# Altium PCB AthetiTech_PCB_V1.0.PcbDoc (part 1 of 3)
Units mm, origin at the board's own origin, x right, y up, seen from the top; angles counter-clockwise.
Board outline 50 x 35 mm, 2 copper layers (Top Layer, Bottom Layer); 161 components, 122 nets, 602 pads, 2 vias.
Unrouted connection lines stored in the file: 390.
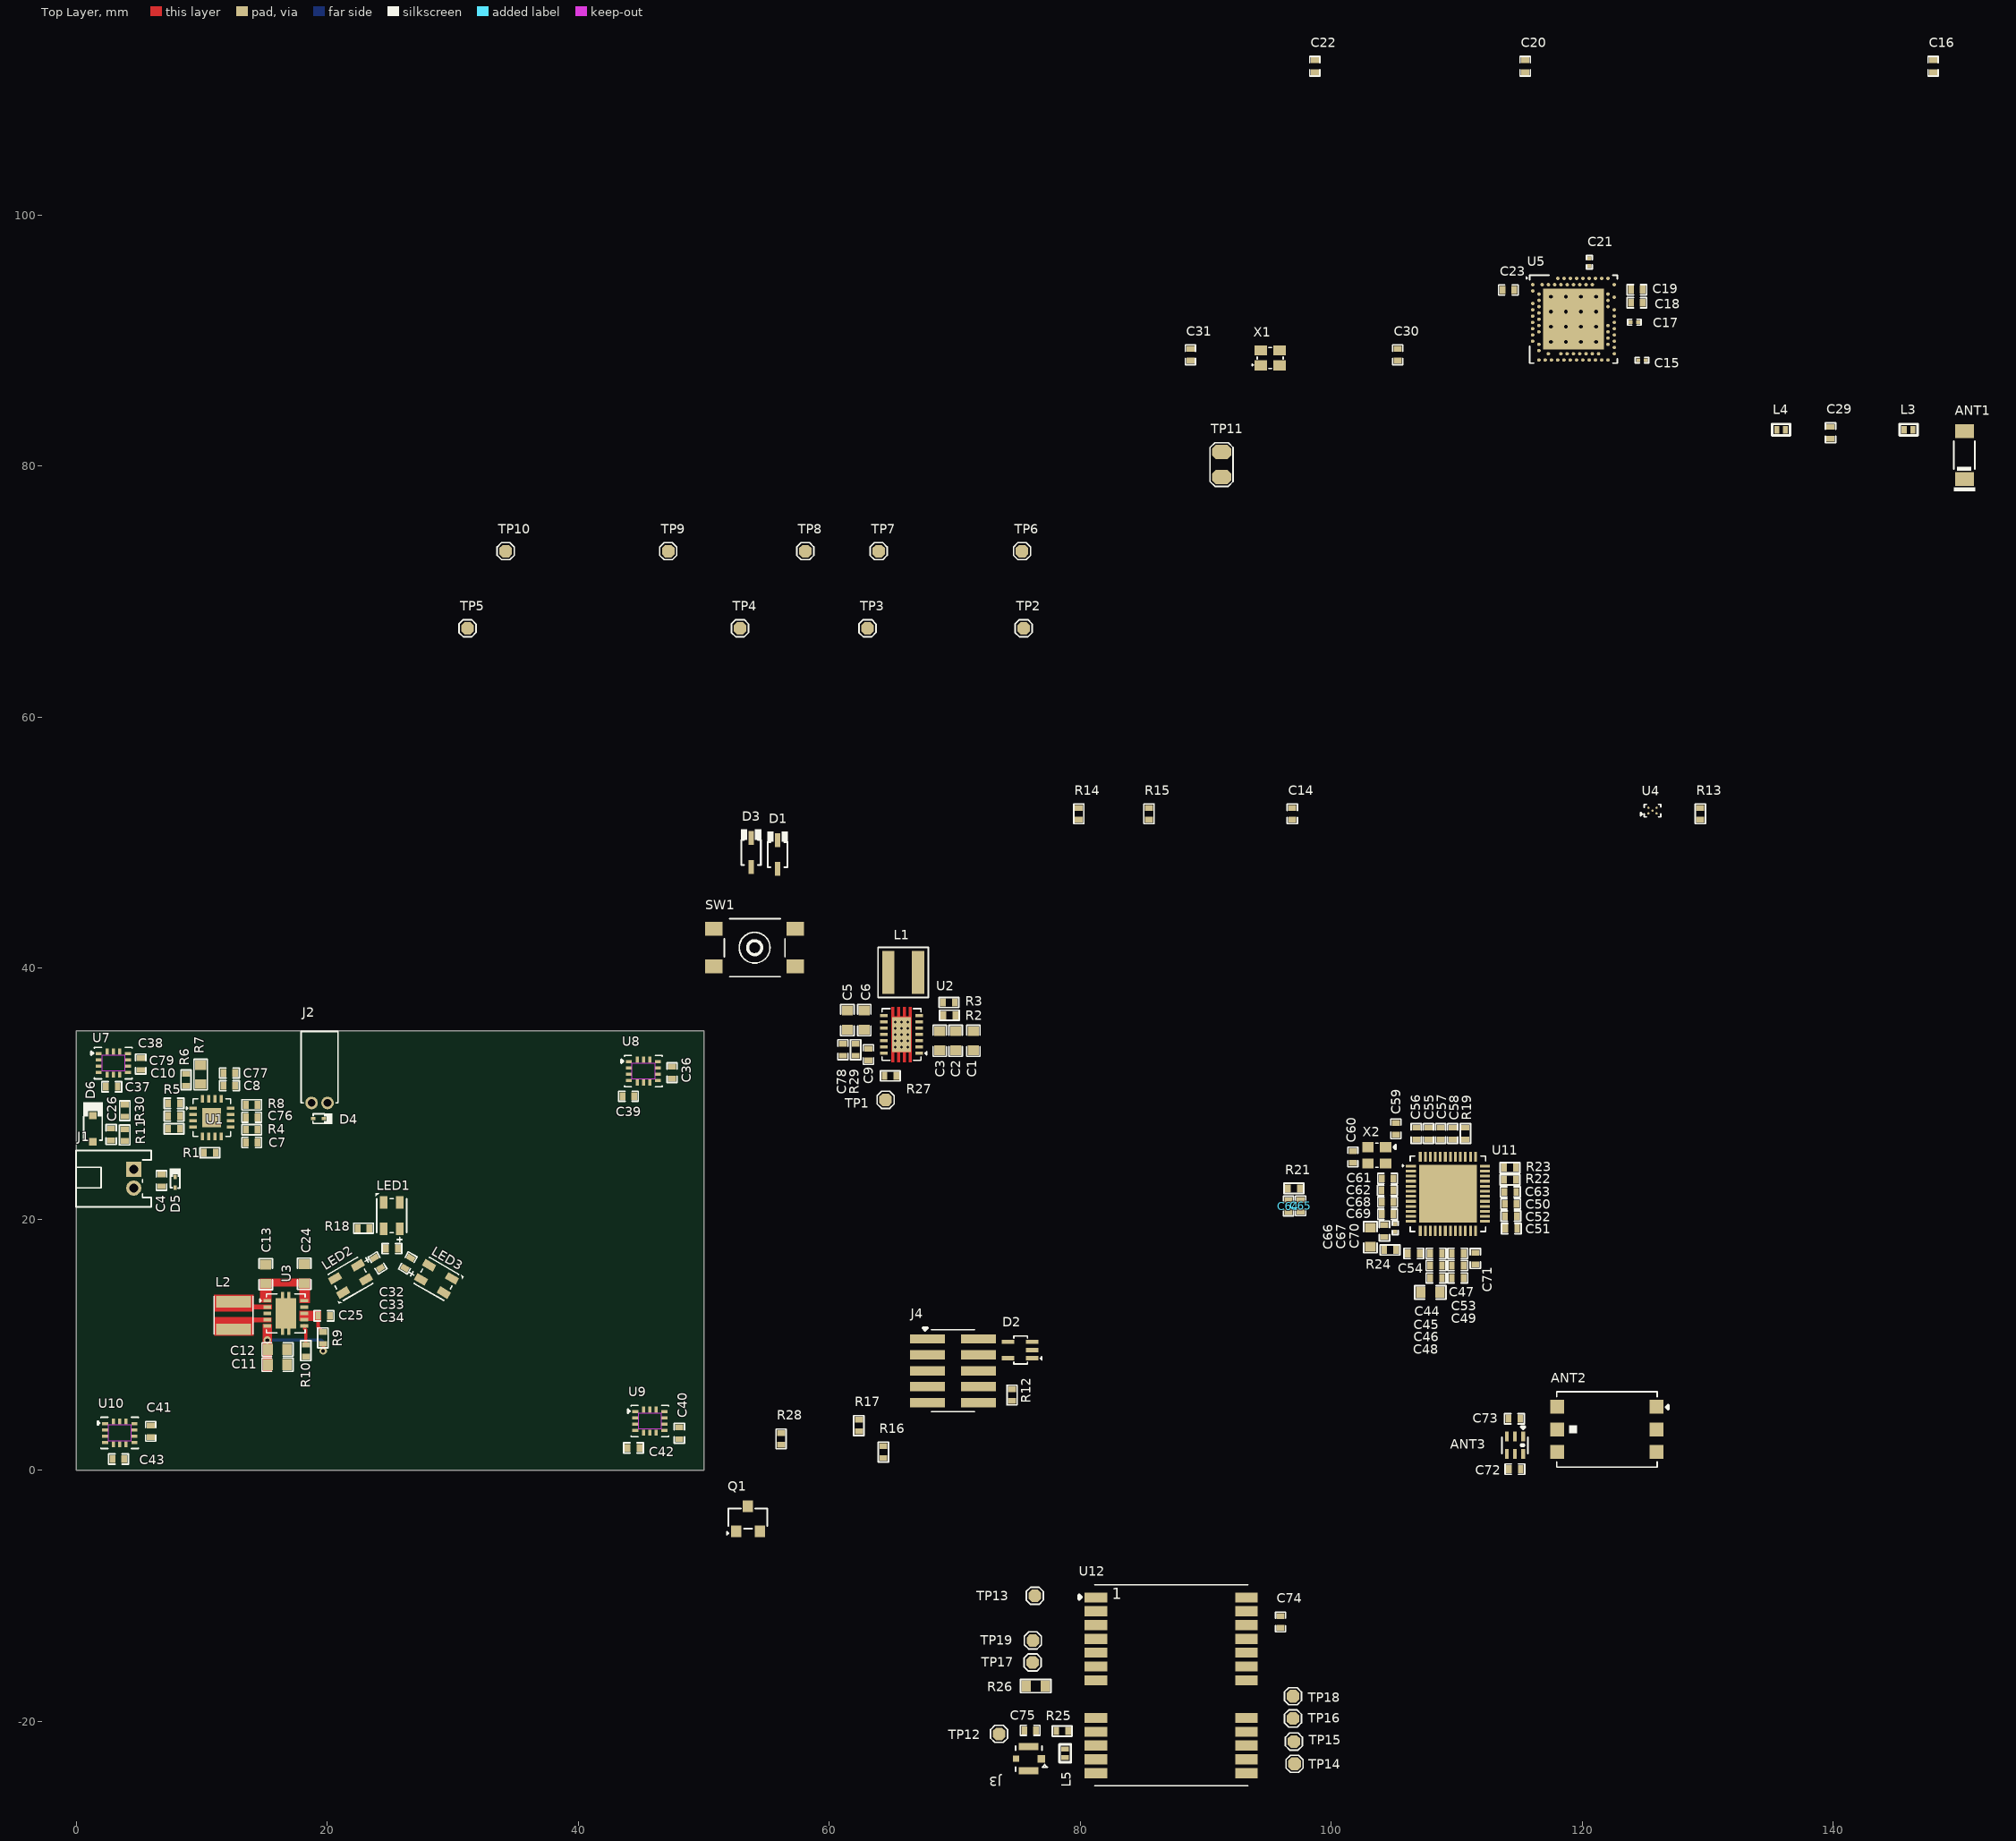
[diagram p0: Top Layer view]
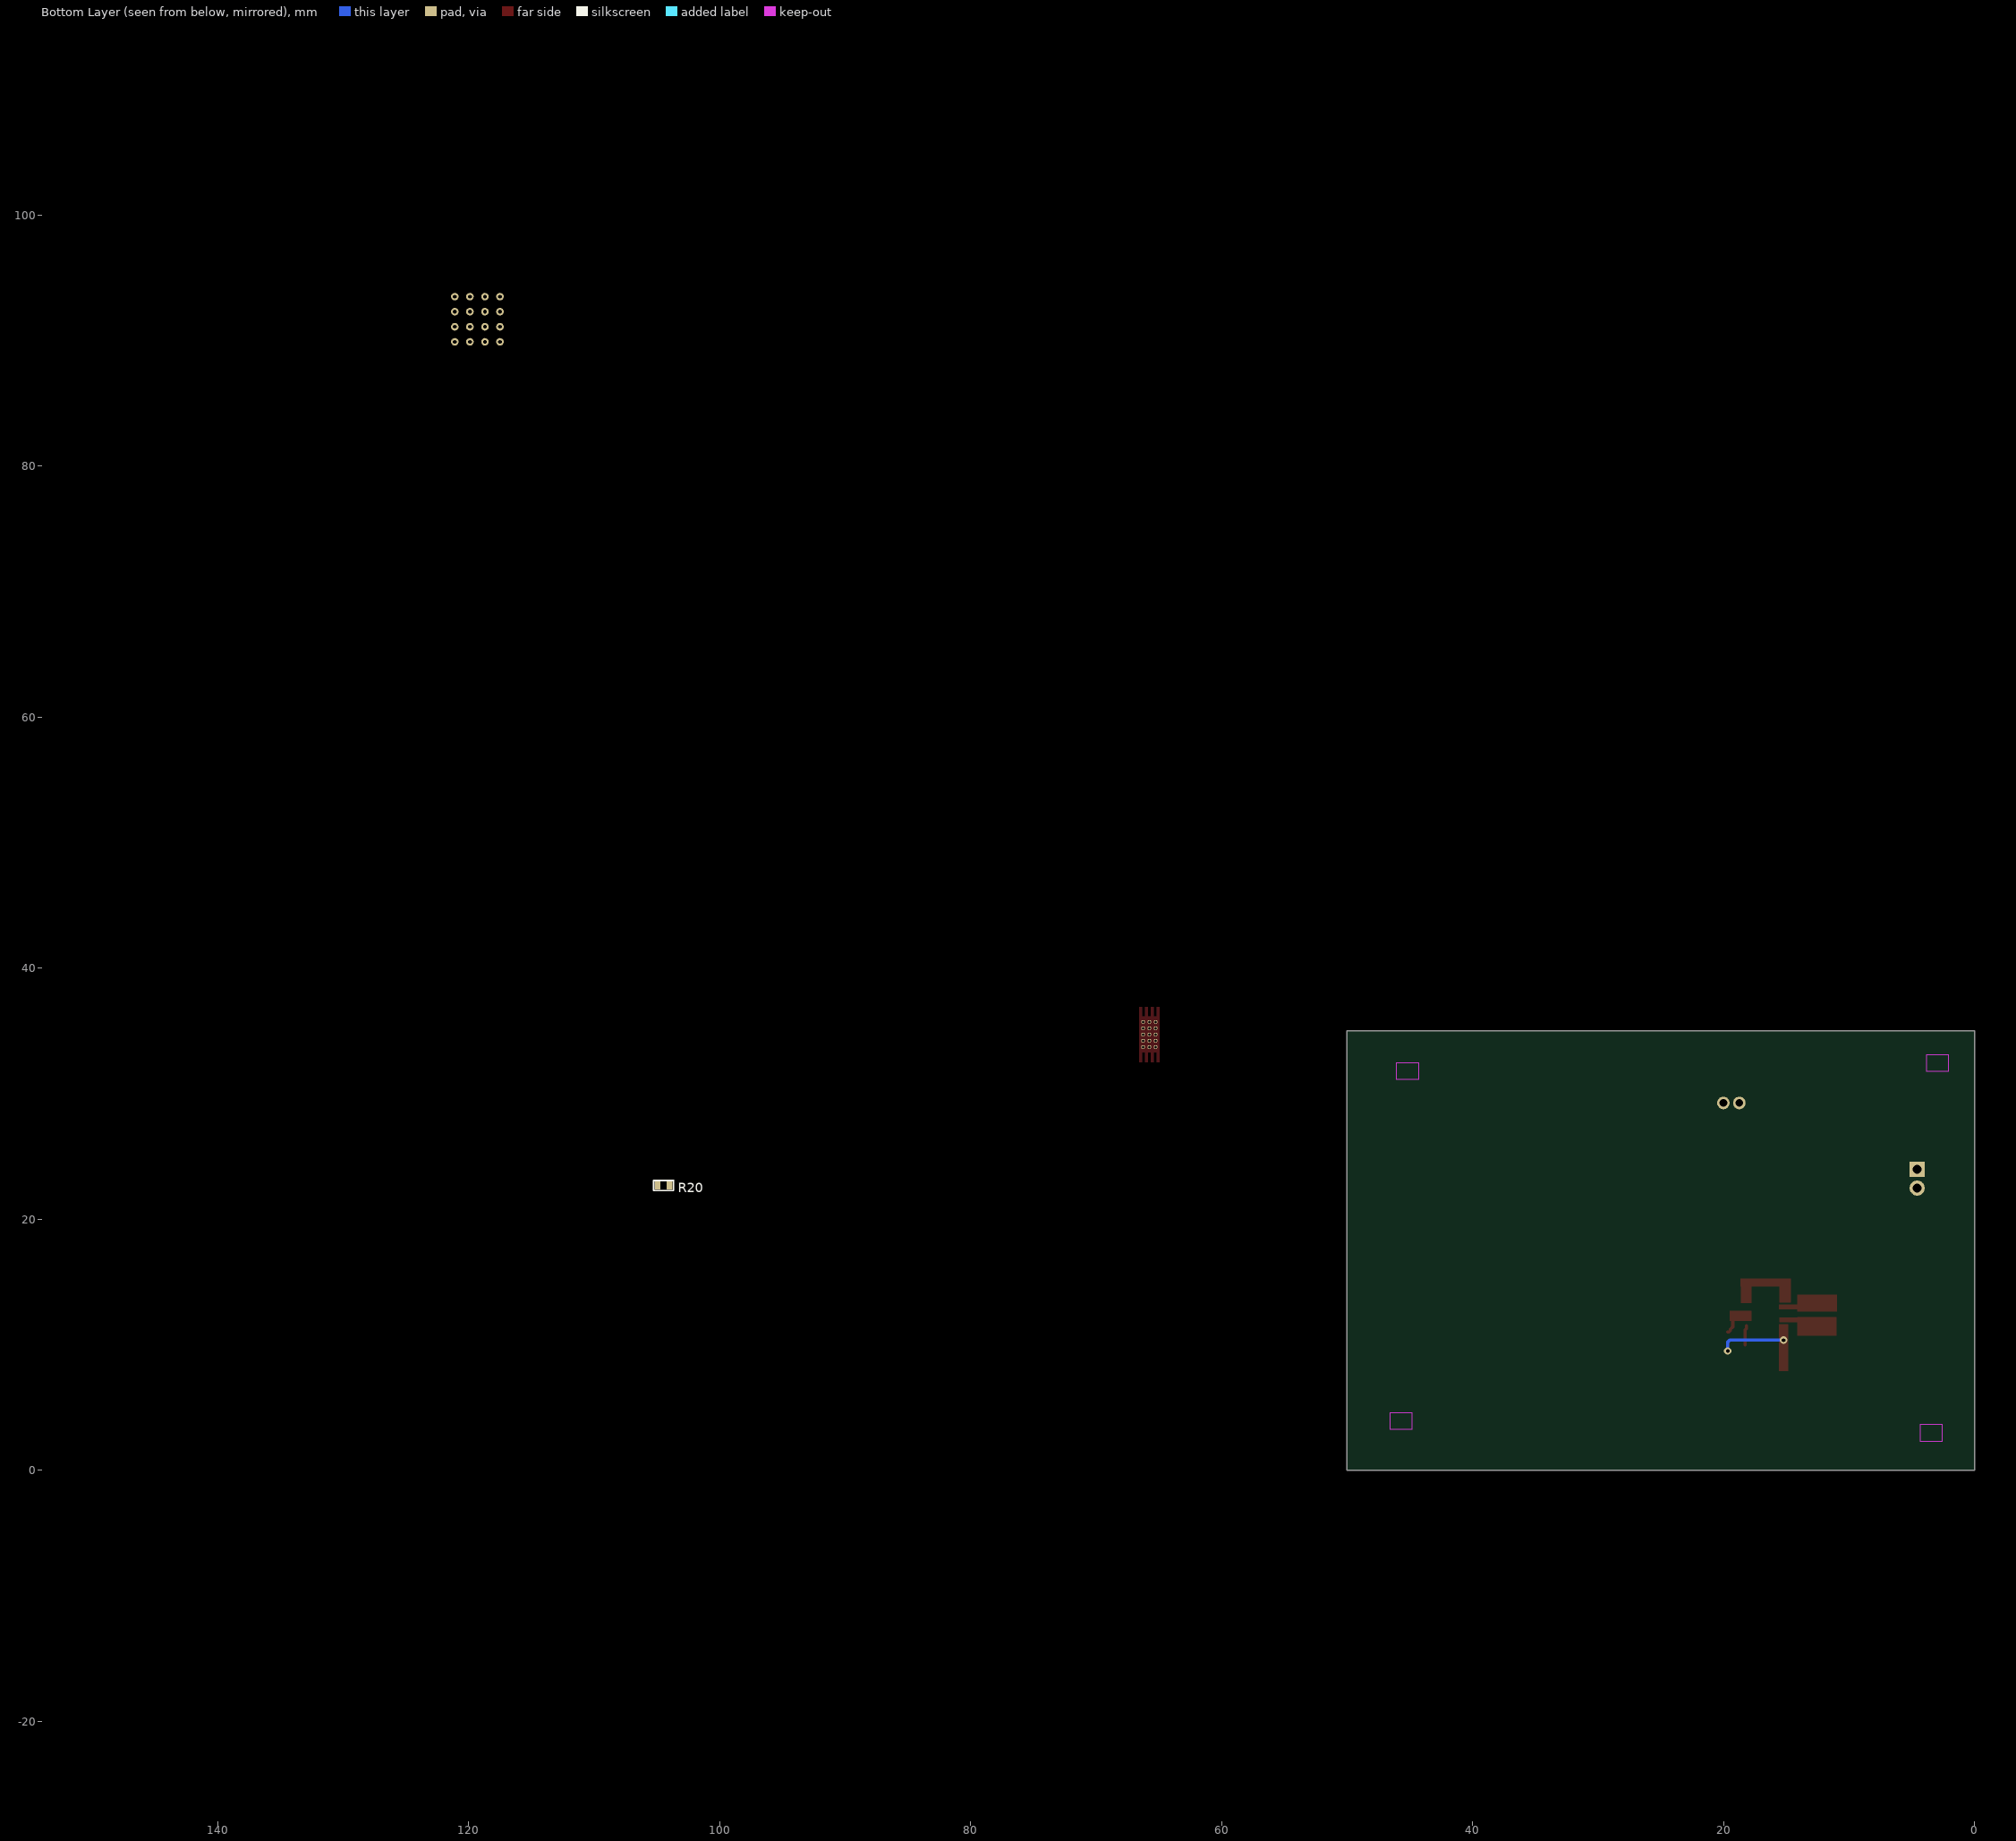
[diagram p1: Bottom Layer view, seen from below]

## Layer stack, top to bottom
Top Solder: solder mask 0.0102, Solder Resist, Dk 3.5
Top Layer: signal copper 0.0356
Dielectric 1: dielectric 0.32, FR-4, Dk 4.8
Bottom Layer: signal copper 0.0356
Bottom Solder: solder mask 0.0102, Solder Resist, Dk 3.5

## Board outline
0,0 0,35 50,35 50,0

## Design rules (kind name [scope] priority, off if disabled: settings)
Clearance [All] p1: gap=0.127 ignorepadtopadclearanceinfootprint=TRUE except(0: Arc-Hole Track-Hole SMDPad-Hole THPad-Hole Via-Hole Fill-Hole Poly-Hole Region-Hole Text-Hole; 0.178: Arc-Arc Arc-Track Arc-Fill Arc-Poly Arc-Region Track-Track Track-Fill Track-Poly Track-Region; 0.254: Arc-THPad Arc-Via Track-THPad Track-Via SMDPad-SMDPad SMDPad-THPad SMDPad-Via THPad-THPad THPad-Via THPad-Fill THPad-Poly THPad-Region Via-Via Via-Fill Via-Poly Via-Region)
PolygonConnect [All] p1: connectstyle=Relief reliefconductorwidth=0.254 reliefentries=4 polygonreliefangle="90 Angle" airgapwidth=0.254
RoutingVias [All] p1: holewidth=0.3 width=0.6 viastyle="Through Hole" minholewidth=0.3 minwidth=0.6 maxholewidth=0.3 maxwidth=0.6
SilkToSilkClearance [All] p1: silktosilkclearance=0.127
SilkToSolderMaskClearance [IsPad] p1: minsilkscreentomaskgap=0.127 clearancetoexposedcopper=TRUE
SolderMaskExpansion [All] p1: expansion=0.102 istentingtop=FALSE
Width [All] p1: maxlimit=0.254 minlimit=0.254 preferedwidth=0.254
28 further rules are at their usual default settings.

## Classes and differential pairs
component class UWB_Sheet: ANT2 ANT3 C44 C45 C46 C47 C48 C49 C50 C51 C52 C53 C54 C55 C56 C57 C58 C59 C60 C61 C62 C63 C64 C65 C66 C67 C68 C69 C70 C71 C72 C73 R19 R20 R21 R22 R23 R24 U11 X2
component class Power_Sheet: C1 C2 C3 C4 C5 C6 C7 C8 C9 C10 C76 C77 C78 C79 D1 D3 D4 D5 J1 J2 L1 R1 R2 R3 R4 R5 R6 R7 R8 R27 R29 SW1 TP1 U1 U2
component class MCU_Sheet: ANT1 C11 C12 C13 C14 C15 C16 C17 C18 C19 C20 C21 C22 C23 C24 C25 C26 C29 C30 C31 C32 C33 C34 D2 D6 J4 L2 L3 L4 LED1 LED2 LED3 Q1 R9 R10 R11 R12 R13 R14 R15 R16 R17 R18 R28 R30 TP2 TP3 TP4 TP5 TP6 TP7 TP8 TP9 TP10 TP11 U3 U4 U5 X1
component class IMU_Sheet: C36 C37 C38 C39 C40 C41 C42 C43 U7 U8 U9 U10
component class GPS_Sheet: C74 C75 J3 L5 R25 R26 TP12 TP13 TP14 TP15 TP16 TP17 TP18 TP19 U12

## Components (designator, comment, footprint, x,y, rotation, side; value= is the part's Value field where it differs from the comment)
ANT1 "2450AT18B100E" ANT-1206 150.457,80.874 r90 top
ANT2 "AH086M555003-T" AH086M555003-T 121.971,3.251 r0 top
ANT3 "HHM1595A1" HHM1595A1 114.645,1.992 r270 top
C1 "22uF" Cap-0603 71.476,34.214 r90 top
C2 "22uF" Cap-0603 70.079,34.214 r90 top
C3 "22uF" Cap-0603 68.809,34.214 r90 top
C4 "470nF" Cap-0402 6.782,23.089 r270 top
C5 "10uF" Cap-0603 61.443,35.865 r270 top
C6 "10uF" Cap-0603 62.789,35.865 r270 top
C7 "470nF" Cap-0402 13.97,26.111 r0 top
C8 "100nF" cap-0402 12.192,30.632 r180 top
C9 "100nF" cap-0402 63.119,33.122 r90 top
C10 "470nF" Cap-0402 7.785,28.219 r180 top
C11 "22uF" Cap-0603 16.027,8.407 r180 top
C12 "10uF" Cap-0603 16.027,9.627 r180 top
C13 "10uF" Cap-0603 15.088,15.621 r270 top
C14 "100nF" cap-0402 96.901,52.299 r90 top
C15 "DNP" CAP-0201 124.77,88.443 r180 top value=4.7pF
C16 "4.7uF" Cap-0402 147.968,111.862 r90 top
C17 "820pF" CAP-0201 124.16,91.465 r180 top
C18 "1uF" Cap-0402 124.358,93.015 r180 top
C19 "100pF" Cap-0402 124.358,94.056 r180 top
C20 "1uF" Cap-0402 115.456,111.862 r90 top
C21 "DNP" CAP-0201 120.574,96.245 r90 top value=4.7pF
C22 "4.7uF" Cap-0402 98.692,111.862 r90 top
C23 "100nF" cap-0402 114.122,94.031 r180 top
C24 "22uF" Cap-0603 18.161,15.646 r270 top
C25 "100nF" cap-0402 19.736,12.294 r0 top
C26 "0.1uF" Cap-0402 2.769,26.746 r90 top value=100nF
C29 "1.2pF" Cap-0402 139.789,82.652 r90 top
C30 "12pF" Cap-0402 105.296,88.875 r90 top
C31 "12pF" Cap-0402 88.786,88.875 r90 top
C32 "100nF" cap-0402 25.146,17.653 r180 top locked
C33 "100nF" cap-0402 26.416,16.51 r60 top locked
C34 "100nF" cap-0402 24.003,16.51 r301 top locked
C36 "100nF" cap-0402 47.473,31.674 r270 top
C37 "100nF" cap-0402 2.819,30.556 r180 top
C38 "100nF" cap-0402 5.131,32.36 r270 top
C39 "100nF" cap-0402 43.993,29.794 r0 top
C40 "100nF" cap-0402 48.057,2.946 r90 top
C41 "100nF" cap-0402 5.918,3.099 r270 top
C42 "100nF" cap-0402 44.399,1.778 r0 top
C43 "100nF" cap-0402 3.353,0.889 r180 top
C44 "10pF" Cap-0402 108.356,17.272 r0 top
C45 "330pF" Cap-0402 108.356,16.307 r0 top
C46 "100nF" Cap-0402 108.356,15.316 r0 top
C47 "100nF" Cap-0402 110.084,17.272 r0 top
C48 "47uF" Cap-0603 107.899,14.173 r0 top
C49 "10pF" Cap-0402 110.084,15.316 r180 top
C50 "100nF" Cap-0402 114.3,21.209 r180 top
C51 "100nF" Cap-0402 114.351,19.253 r180 top
C52 "100nF" Cap-0402 114.325,20.244 r180 top
C53 "330pF" Cap-0402 110.084,16.307 r180 top
C54 "10nF" Cap-0402 106.578,17.272 r0 top
C55 "100nF" Cap-0402 107.747,26.822 r270 top
C56 "100nF" Cap-0402 106.782,26.822 r270 top
C57 "100nF" Cap-0402 108.712,26.822 r270 top
C58 "100nF" Cap-0402 109.677,26.822 r90 top
C59 "10pF" Cap-0402 105.156,27.203 r270 top
C60 "10pF" Cap-0402 101.727,24.956 r90 top
C61 "100nF" Cap-0402 104.496,23.241 r180 top
C62 "100nF" Cap-0402 104.483,22.301 r180 top
C63 "100nF" Cap-0402 114.275,22.174 r0 top
C64 "27pF" Cap-0402 96.596,21.044 r90 top
C65 "1.2pF" Cap-0402 97.561,21.069 r90 top
C66 "820pF" Cap-0603 103.124,18.567 r90 top
C67 "100nF" Cap-0402 104.242,19.063 r90 top
C68 "100nF" Cap-0402 104.496,21.361 r0 top
C69 "100nF" Cap-0402 104.496,20.396 r0 top
C70 "18pF" CAP-0201 105.105,19.304 r90 top
C71 "100nF" Cap-0402 111.481,16.866 r270 top
C72 "12pF" Cap-0402 114.632,0.087 r0 top
C73 "12pF" Cap-0402 114.594,4.101 r0 top
C74 "100nF" cap-0402 95.961,-12.091 r90 top
C75 "100nF" cap-0402 76.01,-20.727 r0 top
C76 "4.7uF" Cap-0402 13.97,28.118 r180 top
C77 "4.7uF" Cap-0402 12.192,31.648 r180 top
C78 "100nF" cap-0402 61.087,33.503 r90 top
C79 "4.7uF" Cap-0402 7.785,29.235 r0 top
D1 "1SS404,H3F" USC 55.728,49.036 r270 top
D2 "ESDALC6V1W5" SOT-323-5 75.209,9.576 r180 top
D3 "1SS404,H3F" USC 53.619,49.2 r270 top
D4 "ESD9L5.0ST5G" SOD-923. 19.304,28.016 r180 top
D5 "ESD9L5.0ST5G" SOD-923. 7.874,22.936 r270 top
D6 "MM3Z3V3B" SOD323F 1.321,27.203 r90 top
J1 "S2B-ZR-3.4(LF)(SN)" S2B-ZR-3.4(LF)(SN) 4.572,23.229 r270 top
J2 "854-22-002-20-041101" 854-22-002-20-041101 19.38,29.261 r180 top
J3 "CONMHF4-SMD-G-T" CONMHF4-SMD-G-T 75.895,-22.987 r90 top
J4 "FTSH-105-01-L-DV-K-TR" FTSH-105-01-L-DV-K-TR 69.85,7.925 r270 top
L1 "1.5uH" XFL4020-152MEC 65.888,39.667 r0 top
L2 "2.2uH" LQH3NPN2R2MJRL 12.522,12.319 r90 top
L3 "3.3nH" IND-0402 146.012,82.906 r0 top
L4 "2.7nH" IND-0402 135.852,82.906 r0 top
L5 "27nH" IND-0402 78.791,-22.555 r270 top
LED1 "WS2812C-2427" WS2812C-2427 25.131,20.286 r90 top locked
LED2 "WS2812C-2427" WS2812C-2427 21.844,15.24 r210 top locked
LED3 "WS2812C-2427" WS2812C-2427 28.702,15.24 r330 top locked
Q1 "Si2302CDS" Sot-23 53.518,-3.861 r0 top
R1 "100K" Res-0402 10.63,25.298 r180 top
R2 "1M" Res-0402 69.571,36.246 r0 top
R3 "180K" Res-0402 69.532,37.262 r180 top value=180kR
R4 "100K" Res-0402 13.97,27.127 r180 top
R5 "10K" Res-0402 7.785,27.203 r0 top
R6 "10K" Res-0402 8.738,31.102 r90 top
R7 "1.13kΩ" Res-0603 9.906,31.521 r270 top
R8 "1.18K" Res-0402 13.97,29.108 r180 top
R9 "100R" Res-0402 19.66,10.541 r270 top
R10 "10K" Res-0402 18.288,9.525 r90 top
R11 "200K" Res-0402 3.861,26.708 r270 top value=200kR
R12 "0R" Res-0402 74.574,5.982 r270 top
R13 "1.2K" Res-0402 129.413,52.299 r90 top
R14 "4.7K" Res-0402 79.883,52.299 r90 top
R15 "4.7K" Res-0402 85.471,52.299 r90 top
R16 "10K" Res-0402 64.313,1.448 r90 top
R17 "10K" Res-0402 62.357,3.556 r90 top
R18 "330R" Res-0402 22.885,19.279 r180 top
R19 "100K" Res-0402 110.693,26.822 r90 top
R20 "11K" Res-0402 104.47,22.682 r0 bottom value=11kR
R21 "16K" Res-0402 97.028,22.454 r0 top value=16R
R22 "10K" Res-0402 114.249,23.139 r180 top
R23 "10K" Res-0402 114.249,24.105 r0 top
R24 "270R" Res-0402 104.699,17.551 r180 top
R25 "10R" Res-0402 78.562,-20.777 r0 top
R26 "0R" Res-0603 76.454,-17.196 r180 top
R27 "1M" Res-0402 64.872,31.42 r180 top
R28 "1K" Res-0402 56.159,2.489 r90 top
R29 "10K" Res-0402 62.103,33.503 r270 top
R30 "100K" Res-0402 3.861,28.651 r90 top
SW1 "TS-1109S-C-B" TS-1109S-C-B 54.051,41.631 r0 top
TP1 "TEST POINT 0.5mm Dia" "Test-point - 0.5mm" 64.491,29.515 r270 top
TP2 "TEST POINT 0.5mm Dia" "Test-point - 0.5mm" 75.489,67.081 r90 top
TP3 "TEST POINT 0.5mm Dia" "Test-point - 0.5mm" 63.043,67.081 r90 top
TP4 "TEST POINT 0.5mm Dia" "Test-point - 0.5mm" 52.883,67.081 r90 top
TP5 "TEST POINT 0.5mm Dia" "Test-point - 0.5mm" 31.166,67.081 r90 top
TP6 "TEST POINT 0.5mm Dia" "Test-point - 0.5mm" 75.362,73.228 r90 top
TP7 "TEST POINT 0.5mm Dia" "Test-point - 0.5mm" 63.932,73.228 r90 top
TP8 "TEST POINT 0.5mm Dia" "Test-point - 0.5mm" 58.09,73.228 r90 top
TP9 "TEST POINT 0.5mm Dia" "Test-point - 0.5mm" 47.168,73.228 r90 top
TP10 "TEST POINT 0.5mm Dia" "Test-point - 0.5mm" 34.214,73.228 r90 top
TP11 "2 Test Pad" "2 Test Pad" 91.262,79.128 r90 top
TP12 "TEST POINT 0.5mm Dia" "Test-point - 0.5mm" 73.533,-21.006 r90 top
TP13 "TEST POINT 0.5mm Dia" "Test-point - 0.5mm" 76.378,-10.008 r90 top
TP14 "TEST POINT 0.5mm Dia" "Test-point - 0.5mm" 97.079,-23.394 r90 top
TP15 "TEST POINT 0.5mm Dia" "Test-point - 0.5mm" 97.028,-21.616 r90 top
TP16 "TEST POINT 0.5mm Dia" "Test-point - 0.5mm" 96.952,-19.787 r90 top
TP17 "TEST POINT 0.5mm Dia" "Test-point - 0.5mm" 76.2,-15.316 r90 top
TP18 "TEST POINT 0.5mm Dia" "Test-point - 0.5mm" 96.952,-18.009 r90 top
TP19 "TEST POINT 0.5mm Dia" "Test-point - 0.5mm" 76.225,-13.564 r90 top
U1 "BQ24075RGTT" VQFN-16(3x3) 10.795,28.093 r0 top
U2 "TPS63020DSJR" "14-VSON (4x3)" 65.761,34.714 r180 top
U3 "TPS63002DRCR" "10-VSON (3x3)" 16.688,12.497 r0 top
U4 "TLV493DA2BWXTMA1" WLCSP-5(0.9x1.1) 125.603,52.553 r0 top
U5 "NRF52840-QIAA-R7" "73-QFN (7x7)" 119.307,91.704 r0 top
U7 "ICM-45686" LGA-14(3x2.5) 2.946,32.436 r0 top
U8 "ICM-45686" LGA-14(3x2.5) 45.187,31.801 r0 top
U9 "ICM-45686" LGA-14(3x2.5) 45.701,3.916 r0 top
U10 "ICM-45686" LGA-14(3x2.5) 3.454,2.972 r0 top
U11 "DW1000-I-TR13" QFN-48-EP(6x6) 109.296,22.026 r0 top
U12 "NEO-M9N-00B" NEO-M9N-00B 81.252,-10.139 r0 top
X1 "32MHz" SMD2016-4P 95.136,88.621 r0 top
X2 "38.4Mhz" XC21M4-38.400-F10NNHPK 103.632,25.095 r180 top

## Footprints (in the part's own frame and the unit in brackets; to place one, negate y for a bottom-side part, rotate by r counter-clockwise, add the part's x,y. Pads: shape width x height; smd on the part's side, far side on the other; paste and mask are expansions set on the pad)
"2 Test Pad" [mil]
  oct 45x60 smd: 1(0,0) 2(78.74,0)
  silkscreen extent -29,-36 108,36
"10-VSON (3x3)" [mm]
  rect 0.62x0.26 smd: 1(-1.475,1) 2(-1.475,0.5) 3(-1.475,0) 4(-1.475,-0.5) 5(-1.475,-1) 6(1.475,-1) 7(1.475,-0.5) 8(1.475,0) 9(1.475,0.5) 10(1.475,1)
  rect 0.25x0.55 smd: 11(-0.25,-1.45) 11(-0.25,1.45) 11(0.25,-1.45) 11(0.25,1.45)
  rect 1.65x2.4 smd: 11(0,0)
  silkscreen extent -2.08,-1.55 1.55,1.55, body extent -1.5,-1.5 1.5,1.5, height 1
"14-VSON (4x3)" [mm]
  rect 0.6x0.24 smd: 1(-1.4,1.5) 2(-1.4,1) 3(-1.4,0.5) 4(-1.4,0) 5(-1.4,-0.5) 6(-1.4,-1) 7(-1.4,-1.5) 8(1.4,-1.5) 9(1.4,-1) 10(1.4,-0.5) 11(1.4,0) 12(1.4,0.5) 13(1.4,1) 14(1.4,1.5)
  round 0.3 hole 0.2: 15(-0.5,0.5) 15(-0.5,1) 15(-0.5,0) 15(-0.5,-1) 15(-0.5,-0.5) 15(0,1) 15(0,0.5) 15(0,0) 15(0,-0.5) 15(0,-1) 15(0.5,0.5) 15(0.5,1) 15(0.5,0) 15(0.5,-1) 15(0.5,-0.5)
  rect 1.5x2.8 smd: 15(0,0)
  Top Layer region: 0.79,-2.2 0.59,-2.2 0.59,-1.425 0.33,-1.425 0.33,-2.2 0.13,-2.2 0.13,-1.425 -0.13,-1.425 -0.13,-2.2 -0.33,-2.2 -0.33,-1.425 -0.59,-1.425 -0.59,-2.2 -0.79,-2.2 -0.79,2.2 -0.59,2.2 -0.59,1.425 -0.33,1.425 -0.33,2.2 -0.13,2.2 -0.13,1.425 0.13,1.425 0.13,2.2 0.33,2.2 0.33,1.425 0.59,1.425 0.59,2.2 0.79,2.2
  silkscreen extent -2.01,-2.06 1.55,2.06, body extent -1.5,-2 1.5,2, height 1
"73-QFN (7x7)" [mm]
  rect 4.85x4.85 smd paste-3: 74(0,0)
  round 0.6 hole 0.305 mask+0: 74_1(-1.8,1.8) 74_2(-0.6,1.8) 74_3(0.6,1.8) 74_4(1.8,1.8) 74_5(-1.8,0.6) 74_6(-0.6,0.6) 74_7(0.6,0.6) 74_8(1.8,0.6) 74_9(-1.8,-0.6) 74_10(-0.6,-0.6) 74_11(0.6,-0.6) 74_12(1.8,-0.6) 74_13(-1.8,-1.8) 74_14(-0.6,-1.8) 74_15(0.6,-1.8) 74_16(1.8,-1.8)
  round 0.275 smd: A8(-1.25,3.25) A10(-0.75,3.25) A12(-0.25,3.25) A14(0.25,3.25) A16(0.75,3.25) A18(1.25,3.25) A20(1.75,3.25) A22(2.25,3.25) A23(2.75,3.25) AA24(3.25,-2.25) AB2(-2.75,-2.5) AC5(-2,-2.75) AC9(-1,-2.75) AC11(-0.5,-2.75) AC13(0,-2.75) AC15(0.5,-2.75) AC17(1,-2.75) AC19(1.5,-2.75) AC21(2,-2.75) AC24(3.25,-2.75) AD2(-2.75,-3.25) AD4(-2.25,-3.25) AD6(-1.75,-3.25) AD8(-1.25,-3.25) AD10(-0.75,-3.25) AD12(-0.25,-3.25) AD14(0.25,-3.25) AD16(0.75,-3.25) AD18(1.25,-3.25) AD20(1.75,-3.25) AD22(2.25,-3.25) AD23(2.75,-3.25) B1(-3.25,2.75) B3(-2.5,2.75) B5(-2,2.75) B7(-1.5,2.75) B9(-1,2.75) B11(-0.5,2.75) B13(0,2.75) B15(0.5,2.75) B17(1,2.75) B19(1.5,2.75) B24(3.25,2.75) C1(-3.25,2.25) D2(-2.75,2) D23(2.75,2) E24(3.25,1.75) F2(-2.75,1.5) F23(2.75,1.5) G1(-3.25,1.25) H2(-2.75,1) H23(2.75,1) J1(-3.25,0.75) J24(3.25,0.75) K2(-2.75,0.5) L1(-3.25,0.25) L24(3.25,0.25) M2(-2.75,0) N1(-3.25,-0.25) N24(3.25,-0.25) P2(-2.75,-0.5) P23(2.75,-0.5) R1(-3.25,-0.75) R24(3.25,-0.75) T2(-2.75,-1) T23(2.75,-1) U1(-3.25,-1.25) U24(3.25,-1.25) V23(2.75,-1.5) W1(-3.25,-1.75) W24(3.25,-1.75) Y2(-2.75,-2) Y23(2.75,-2)
  silkscreen extent -3.76,-3.5 3.5,3.5, body extent -3.5,-3.5 3.5,3.5, height 0.85
854-22-002-20-041101 [mm]
  round 1 hole 0.62: 1(-0.635,0) 2(0.635,0)
  silkscreen extent -1.47,-5.69 1.47,0, body extent -1.45,-7.35 1.47,0.19, height 2.16
AH086M555003-T [mm]
  rect 1.1x1.1 smd: 1(3.95,1.8) 2(3.95,0) 3(3.95,-1.8) 4(-3.95,-1.8) 5(-3.95,0) 6(-3.95,1.8)
  silkscreen extent -4,-3 4.88,3, body extent -4.01,-3 4.01,3, height 1.02
ANT-1206 [mm]
  rect 1.1x1.5 smd: 1(-1.9,0) 2(1.9,0)
  silkscreen extent -2.89,-0.86 1.12,0.84, body extent -1.6,-0.8 1.6,0.8, height 1
CAP-0201 [mm]
  rect 0.3x0.3 smd mask+0.055: 1(-0.3,0) 2(0.3,0)
  silkscreen extent -0.53,-0.23 0.53,0.23, body extent -0.3,-0.15 0.3,0.15, height 0.28
Cap-0402 [mil]
  rect 18x25 smd mask+2.36: 1(-18.5,0) 2(18.5,0)
  silkscreen extent -31,-16 31,16, body extent -20,-10 20,10, height 19
cap-0402 [mil]
  rect 18x25 smd mask+2.36: 1(-18.5,0) 2(18.5,0)
  silkscreen extent -31,-16 31,16, body extent -20,-10 20,10, height 19
Cap-0603 [mil]
  rect 30x35 smd mask+2.36: 1(-30,0) 2(30,0)
  silkscreen extent -49,-21 49,21, body extent -32,-16 31,16, height 34
CONMHF4-SMD-G-T [mm]
  rect 0.6x0.6 smd: 1(0,-1)
  rect 0.58x1.58 smd: S1(-0.96,0) S3(0.96,0)
  rect 0.5x0.5 smd: S2(0,1)
  silkscreen extent -1,-1.48 1,1.05, body extent -1,-1 1,1, height 0.6
FTSH-105-01-L-DV-K-TR [mm]
  rect 0.74x2.79 smd: 01(-2.54,-2.035) 02(-2.54,2.035) 03(-1.27,-2.035) 04(-1.27,2.035) 05(0,-2.035) 06(0,2.035) 07(1.27,-2.035) 08(1.27,2.035) 09(2.54,-2.035) 10(2.54,2.035)
  silkscreen extent -3.4,-2.37 3.26,1.72, body extent -3.18,-2.92 3.18,2.92, height 5.96
HHM1595A1 [mm]
  rect 0.8x0.3 smd: 1(-0.7,0.65) 2(-0.7,0) 3(-0.7,-0.65) 4(0.7,-0.65) 5(0.7,0) 6(0.7,0.65)
  silkscreen extent -1.46,-1.03 0.65,1.03, body extent -0.63,-1 0.63,1, height 0.95
IND-0402 [mm]
  rect 0.4x0.6 smd: 1(-0.35,0) 2(0.35,0)
  silkscreen extent -0.71,-0.46 0.71,0.46, body extent -0.5,-0.25 0.5,0.25, height 0.25
LGA-14(3x2.5) [mm]
  rect 0.475x0.25 smd mask+0.05: 1(-1.162,0.75) 2(-1.162,0.25) 3(-1.162,-0.25) 4(-1.162,-0.75) 8(1.162,-0.75) 9(1.162,-0.25) 10(1.162,0.25) 11(1.162,0.75)
  rect 0.25x0.475 smd mask+0.05: 5(-0.5,-0.913) 6(0,-0.913) 7(0.5,-0.913) 12(0.5,0.913) 13(0,0.913) 14(-0.5,0.913)
  Keep-Out Layer region: 0.9,-0.65 -0.9,-0.65 -0.9,0.65 0.9,0.65
  silkscreen extent -1.75,-1.25 1.5,1.25, body extent -1.5,-1.25 1.5,1.25, height 0.86
LQH3NPN2R2MJRL [mm]
  rect 0.9x2.8 smd: 1(-1.1,0) 2(1.1,0)
  silkscreen extent -1.47,-1.55 1.52,1.55, body extent -1.5,-1.5 1.5,1.5, height 1.2
NEO-M9N-00B [mm]
  rect 1.8x0.8 smd paste-2: 1(0,0) 2(0,-1.1) 3(0,-2.2) 4(0,-3.3) 5(0,-4.4) 6(0,-5.5) 7(0,-6.6) 8(0,-9.6) 9(0,-10.7) 10(0,-11.8) 11(0,-12.9) 12(0,-14) 13(12,-14) 14(12,-12.9) 15(12,-11.8) 16(12,-10.7) 17(12,-9.6) 18(12,-6.6) 19(12,-5.5) 20(12,-4.4) 21(12,-3.3) 22(12,-2.2) 23(12,-1.1) 24(12,0)
  silkscreen extent -1.35,-15 12.1,1, body extent -0.1,-15 12.1,1, height 2.6
QFN-48-EP(6x6) [mm]
  rect 0.81x0.22 smd mask+0.07: 1(-2.95,2.2) 2(-2.95,1.8) 3(-2.95,1.4) 4(-2.95,1) 5(-2.95,0.6) 6(-2.95,0.2) 7(-2.95,-0.2) 8(-2.95,-0.6) 9(-2.95,-1) 10(-2.95,-1.4) 11(-2.95,-1.8) 12(-2.95,-2.2) 25(2.95,-2.2) 26(2.95,-1.8) 27(2.95,-1.4) 28(2.95,-1) 29(2.95,-0.6) 30(2.95,-0.2) 31(2.95,0.2) 32(2.95,0.6) 33(2.95,1) 34(2.95,1.4) 35(2.95,1.8) 36(2.95,2.2)
  rect 0.22x0.81 smd mask+0.07: 13(-2.2,-2.95) 14(-1.8,-2.95) 15(-1.4,-2.95) 16(-1,-2.95) 17(-0.6,-2.95) 18(-0.2,-2.95) 19(0.2,-2.95) 20(0.6,-2.95) 21(1,-2.95) 22(1.4,-2.95) 23(1.8,-2.95) 24(2.2,-2.95) 37(2.2,2.95) 38(1.8,2.95) 39(1.4,2.95) 40(1,2.95) 41(0.6,2.95) 42(0.2,2.95) 43(-0.2,2.95) 44(-0.6,2.95) 45(-1,2.95) 46(-1.4,2.95) 47(-1.8,2.95) 48(-2.2,2.95)
  rect 4.6x4.6 smd paste-3: 49(0,0)
  silkscreen extent -3.61,-3 3,3, body extent -3,-3 3,3, height 0.9
Res-0402 [mil]
  rect 18x25 smd mask+2.17: 1(-18.5,0) 2(18.5,0)
  silkscreen extent -32,-17 32,16, body extent -23,-11 23,11, height 16
Res-0603 [mil]
  rect 30x35 smd: 1(-30,0) 2(30,0)
  silkscreen extent -48,-21 48,21, body extent -31,-17 31,17, height 18
S2B-ZR-3.4(LF)(SN) [mm]
  rect 1.2x1.2 hole 0.7: 1(-0.75,0)
  round 1.2 hole 0.7: 2(0.75,0)
  silkscreen extent -2.25,-4.6 2.25,1.4, body extent -2.25,-4.62 2.25,1.38, height 3.6
SMD2016-4P [mm]
  rect 1x0.8 smd paste+0 mask+0.051: 1(-0.75,-0.6) 2(0.75,-0.6) 3(0.75,0.6) 4(-0.75,0.6)
  silkscreen extent -1.42,-0.84 1.04,0.84, body extent -1,-0.8 1,0.8, height 0.47
SOD323F [mm]
  rect 0.6x0.6 smd: 1(-1.05,0) 2(1.05,0)
  silkscreen extent -0.91,-0.79 2.11,0.79, body extent -1.25,-0.68 1.25,0.68, height 1
SOD-923. [mm]
  rect 0.36x0.27 smd: 1(-0.42,0) 2(0.42,0)
  silkscreen extent -1.12,-0.43 0.46,0.43, body extent -0.52,-0.32 0.53,0.33, height 0.43
Sot-23 [mm] "TRANS NPN 40V 0.6A SOT23"
  rect 0.82x0.92 smd: 1(-0.95,-1) 2(0.95,-1) 3(0,1)
  silkscreen extent -1.68,-1.3 1.55,0.81, body extent -1.5,-1.25 1.5,1.25, height 1.05
SOT-323-5 [mm]
  rect 1x0.35 smd: 1(-0.95,0.65) 2(-0.95,0) 3(-0.95,-0.65) 4(0.95,-0.65) 5(0.95,0.65)
  silkscreen extent -1.73,-1.12 0.51,1.12, body extent -1.05,-1.05 1.05,1.05, height 1
"Test-point - 0.5mm" [mm]
  oct 1x1 smd: 1(0,0)
  silkscreen extent -0.68,-0.68 0.68,0.68
TS-1109S-C-B [mm]
  rect 1.4x1.1 smd: 1(-3.25,-1.5) 2(3.25,-1.5) 3(3.25,1.5) 4(-3.25,1.5)
  silkscreen extent -2.41,-2.31 2.41,2.31, body extent -3.5,-2.25 3.5,2.25, height 4.3
USC [mil]
  rect 43.75x17.75 smd: 1(-46,6) 2(44.55,6)
  silkscreen extent -73,-27 39,38, body extent -54,-20 52,32, height 43
VQFN-16(3x3) [mm]
  rect 0.6x0.25 smd paste-100 mask+0.051: 1(-1.5,0.748) 2(-1.5,0.249) 3(-1.5,-0.252) 4(-1.5,-0.751) 9(1.5,-0.75) 10(1.5,-0.25) 11(1.5,0.25) 12(1.5,0.748)
  rect 0.25x0.6 smd paste-100 mask+0.051: 5(-0.748,-1.5) 6(-0.248,-1.5) 7(0.252,-1.5) 8(0.752,-1.5) 13(0.752,1.5) 14(0.252,1.5) 15(-0.248,1.5) 16(-0.748,1.5)
  rect 1.5x1.5 smd paste-100 mask+0.051: 17(0,0)
  silkscreen extent -2.03,-1.5 1.5,1.5, body extent -1.51,-1.5 1.49,1.5, height 1
WLCSP-5(0.9x1.1) [mm]
  round 0.18 smd paste-100 mask+0.05: A1(-0.329,-0.229) A3(-0.329,0.229) B2(0,0) C1(0.329,-0.229) C3(0.329,0.229)
  silkscreen extent -0.94,-0.5 0.66,0.5, body extent -0.57,-0.47 0.57,0.46, height 0.59
WS2812C-2427 [mm]
  rect 1x0.6 smd paste+0 mask+0.051: 1(-1.05,0.65) 2(-1.05,-0.65) 3(1.05,-0.65) 4(1.05,0.65)
  silkscreen extent -2.1,-1.2 1.78,1.27, body extent -1.35,-1.2 1.35,1.2, height 1.12
XC21M4-38.400-F10NNHPK [mm]
  rect 0.9x0.8 smd: 1(-0.7,-0.65) 2(0.7,-0.65) 3(0.7,0.65) 4(-0.7,0.65)
  silkscreen extent -1.51,-0.97 0.1,0.97
XFL4020-152MEC [mm]
  rect 0.98x3.4 smd: 1(-1.185,0) 2(1.185,0)
  silkscreen extent -2,-2 2,2, body extent -1.99,-2.01 2.01,1.99, height 2.1

## Part data
ANT1: "RF ANT 2.4GHZ CHIP SOLDER SMD", Manufacturer=Johanson, Category="RF Antennas", ComponentLink1Description=https://datasheet.ciiva.com/24025/antenna-2450at18b100-242422-24025839.pdf?src-supplier=Mouser, ComponentLink1URL=https://datasheet.ciiva.com/24025/antenna-2450at18b100-242422-24025839.pdf?src-supplier=Mouser, ComponentLink2Description=https://datasheet.ciiva.com/1124/1318299-1124918.pdf?src-supplier=Element14, ComponentLink2URL=https://datasheet.ciiva.com/1124/1318299-1124918.pdf?src-supplier=Element14, Manufacturer Part Number=2450AT18B100E, Pricing="3000=0.3724, 6000=0.3688, 9000=0.3651, 12000=0.3615, 15000=0.3579, 30000=0.3542 (USD)", RoHS=Yes, Stock=792000, Supplier="Arrow Electronics", Supplier Part Number=2450AT18B100E
ANT2: "RF ANT 3.5GHZ/5.6GHZ CHIP SLD", LCSC Part Number=C94132, Manufacturer="Taiyo Yuden", ComponentLink1Description=https://datasheet.ciiva.com/2791/ah-086m555003-ss-2791894.pdf?src-supplier=Digikey, ComponentLink1URL=https://datasheet.ciiva.com/2791/ah-086m555003-ss-2791894.pdf?src-supplier=Digikey, ComponentLink2Description=https://datasheet.ciiva.com/28414/1918813-28414122.pdf?src-supplier=Element14, ComponentLink2URL=https://datasheet.ciiva.com/28414/1918813-28414122.pdf?src-supplier=Element14, ComponentLink3Description=https://datasheet.ciiva.com/3306/chipantenna01-e-3306567.pdf?src-supplier=Avnet, ComponentLink3URL=https://datasheet.ciiva.com/3306/chipantenna01-e-3306567.pdf?src-supplier=Avnet, ComponentLink4Description=https://datasheet.ciiva.com/8153/chipantenna01-e-8153000.pdf?src-supplier=Avnet, ComponentLink4URL=https://datasheet.ciiva.com/8153/chipantenna01-e-8153000.pdf?src-supplier=Avnet, ComponentLink5Description=https://datasheet.ciiva.com/1125/chipantenna01-e-1125194.pdf?src-supplier=Element14, ComponentLink5URL=https://datasheet.ciiva.com/1125/chipantenna01-e-1125194.pdf?src-supplier=Element14, ComponentLink6Description=https://datasheet.ciiva.com/2791/chipantenna01-e-2791895.pdf?src-supplier=Digikey, ComponentLink6URL=https://datasheet.ciiva.com/2791/chipantenna01-e-2791895.pdf?src-supplier=Digikey, ComponentLink7Description=https://datasheet.ciiva.com/2791/chipantenna01-e-2791896.pdf?src-supplier=Digikey, ComponentLink7URL=https://datasheet.ciiva.com/2791/chipantenna01-e-2791896.pdf?src-supplier=Digikey, Item Type="RF Antennas", Manufacturer Part Number=AH086M555003-T, Pricing="1=7.98, 10=5.341, 25=4.6536, 100=3.8766, 250=3.49504, 500=3.375 (USD)", RoHS=Yes, Stock=4192, Supplier=Digikey
ANT3: "BALUN 3GHZ-8GHZ 50/100 0805", LCSC Part Number=C112665, Manufacturer=TDK, ComponentLink1Description=https://datasheet.ciiva.com/4547/e751-multibalun-hhm18-20070-4547862.pdf?src-supplier=Mouser, ComponentLink1URL=https://datasheet.ciiva.com/4547/e751-multibalun-hhm18-20070-4547862.pdf?src-supplier=Mouser, ComponentLink2Description=https://datasheet.ciiva.com/30013/rf-balun-hhm1595a1-en-30013313.pdf?src-supplier=Avnet, ComponentLink2URL=https://datasheet.ciiva.com/30013/rf-balun-hhm1595a1-en-30013313.pdf?src-supplier=Avnet, ComponentLink3Description=https://datasheet.ciiva.com/2788/rf-balun-hhm1583b1-en-2788708.pdf?src-supplier=Digikey, ComponentLink3URL=https://datasheet.ciiva.com/2788/rf-balun-hhm1583b1-en-2788708.pdf?src-supplier=Digikey, ComponentLink4Description=https://datasheet.ciiva.com/2788/rf-balun-hhm1583b1-en-2788709.pdf?src-supplier=Digikey, ComponentLink4URL=https://datasheet.ciiva.com/2788/rf-balun-hhm1583b1-en-2788709.pdf?src-supplier=Digikey, ComponentLink5Description=https://datasheet.ciiva.com/2788/rf-balun-hhm1583b1-en-2788710.pdf?src-supplier=Digikey, ComponentLink5URL=https://datasheet.ciiva.com/2788/rf-balun-hhm1583b1-en-2788710.pdf?src-supplier=Digikey, Item Type=C112665, Manufacturer Part Number=HHM1595A1, Pricing="1=0.34, 10=0.312, 25=0.3008, 50=0.292, 100=0.2836, 250=0.27264, 500=0.26456, 1000=0.25667 (USD)", RoHS=Yes, Stock=8835, Supplier=Digikey
C1 C2 C3 C11 C24: library part CC0603MRX5R6BB226, "CAP CER 22UF 10V X5R 0603", Case Code (Imperial)=0603, Case Code (Metric)=1608, Dielectric=X5R, LCSC Part Number=C109447, Manufacturer=Yageo, Max Operating Temperature=85°C, Min Operating Temperature=-55°C, Package Quantity=4000, Supplier Part Number 1=311-1819-1-ND, Tolerance=20%, Voltage Rating=10V, Capacitance=22uF, Case/Package=0603, Category="Ceramic Capacitors", ComponentLink1Description=http://www.mouser.com/ds/2/447/Yageo_UPY-GP_NP0_16V-to-50V_9-358835.pdf?src-supplier=Mouser, ComponentLink1URL=http://www.mouser.com/ds/2/447/Yageo_UPY-GP_NP0_16V-to-50V_9-358835.pdf?src-supplier=Mouser, ComponentLink2Description=http://www.yageo.com/documents/recent/UPY-GPHC_X5R_4V-to-50V_25.pdf?src-supplier=Digi-Key, ComponentLink2URL=http://www.yageo.com/documents/recent/UPY-GPHC_X5R_4V-to-50V_25.pdf?src-supplier=Digi-Key, Halogen Free="Halogen Free", Height=0.8mm, Item Type=Capacitor, Lead Free="Lead Free", Length=0.063inch, Manufacturer Part Number=CC0603MRX5R6BB226, Mount="Surface Mount", Packaging="Tape and Reel", Pricing 1="1=0.68000, 10=0.48000, 50=0.36300, 100=0.31610, 500=0.23416, 1000=0.19903 (USD)", RoHS=Yes, RoHS Compliant=Yes, Stock 1=19628, Supplier 1=Digi-Key, Termination=SMD/SMT, Thickness=0.035inch, Voltage Rating (DC)=10V, Weight=7.1E-05oz, Width=0.8mm
C4 C7 C10: library part CL05A474KA5NNNC, "CAP CER 0.47UF 25V X5R 0402", Case Code (Imperial)=0402, Case Code (Metric)=1005, Manufacturer=Samsung, Max Operating Temperature=85°C, Min Operating Temperature=-55°C, Tolerance=10%, Voltage Rating=25V, Case/Package=0402, Category="Ceramic Capacitors", ComponentLink1Description=https://datasheet.ciiva.com/25796/cl05a474ka5nnnc-25796037.pdf?src-supplier=Digikey, ComponentLink1URL=https://datasheet.ciiva.com/25796/cl05a474ka5nnnc-25796037.pdf?src-supplier=Digikey, ComponentLink2Description=https://datasheet.ciiva.com/29198/458859-da-01-en-vs-kondensator-0402-29198303.pdf?src-supplier=Conrad, ComponentLink2URL=https://datasheet.ciiva.com/29198/458859-da-01-en-vs-kondensator-0402-29198303.pdf?src-supplier=Conrad, Height=550um, Lead Free="Lead Free", Manufacturer Part Number=CL05A474KA5NNNC, Material=Ceramic, Mounting Technology="Surface Mount", Packaging="Cut Tape", Pricing="100000=0.02563 (USD)", RoHS=Yes, RoHS Compliant=Yes, Series=CL, Stock=80000, Supplier=Avnet, Supplier Part Number=CL05A474KA5NNNC, Voltage Rating (DC)=25V
C5 C6: library part GRT188R61E106ME13D, "CAP CER 10UF 25V X5R 0603", Case Code (Imperial)=0603, Case Code (Metric)=1608, Dielectric=X5R, LCSC Part Number=C697423, Manufacturer=Murata, Max Operating Temperature=85°C, Min Operating Temperature=-55°C, Package Quantity=4000, Ratings=AEC-Q200, Tolerance=20%, Voltage Rating=25V, Case/Package=0603, ComponentLink1Description=https://datasheet.octopart.com/GRT188R61E106ME13D-Murata-datasheet-149523595.pdf?src-supplier=Newark, ComponentLink1URL=https://datasheet.octopart.com/GRT188R61E106ME13D-Murata-datasheet-149523595.pdf?src-supplier=Newark, ComponentLink2Description=https://datasheet.octopart.com/GRT188R61E106ME13D-Murata-datasheet-82944876.pdf?src-supplier=Future+Electronics, ComponentLink2URL=https://datasheet.octopart.com/GRT188R61E106ME13D-Murata-datasheet-82944876.pdf?src-supplier=Future+Electronics, ComponentLink3Description=http://search.murata.co.jp/Ceramy/image/img/A01X/G101/ENG/GRT188R61E106ME13-01.pdf?src-supplier=Digikey, ComponentLink3URL=http://search.murata.co.jp/Ceramy/image/img/A01X/G101/ENG/GRT188R61E106ME13-01.pdf?src-supplier=Digikey, ComponentLink4Description=https://search.murata.co.jp/Ceramy/image/img/A01X/G101/ENG/GRT188R61E106ME13-01.pdf?src-supplier=Digikey, ComponentLink4URL=https://search.murata.co.jp/Ceramy/image/img/A01X/G101/ENG/GRT188R61E106ME13-01.pdf?src-supplier=Digikey, ComponentLink5Description=https://datasheet.octopart.com/GRT188R61E106ME13D-Murata-datasheet-165579666.pdf?src-supplier=TME, ComponentLink5URL=https://datasheet.octopart.com/GRT188R61E106ME13D-Murata-datasheet-165579666.pdf?src-supplier=TME, Height=0.8mm, Item Type=Capacitors, Length=1.6mm, Manufacturer Part Number=GRT188R61E106ME13D, Material=4241ConductorMaterial, Mounting Technology="Surface Mount", Packaging="Cut Tape", Pricing="4000=0.0522, 8000=0.0514, 12000=0.0509, 20000=0.0503, 40000=0.049 (USD)", RoHS=No, RoHS Compliant=No, Series=GRT, Stock=444000, Supplier="Future Electronics", Termination=Standard, Voltage Rating (DC)=25V, Weight=0.000917oz, Width=0.8mm
C8 C9 C14 C23 C25 C32 C33 C34 C36 C37 C38 C39 C40 C41 C42 C43 C74 C75 C78: library part C1005X7R1H104KT000F, "CAP CER 0.1UF 50V X7R 0402", Dielectric=X7R, LCSC Part Number=C361198, Manufacturer=TDK, Tolerance=10%, Voltage=25V, Category="Ceramic Capacitors", ComponentLink1Description=LCSC, ComponentLink1URL=https://www.lcsc.com/product-detail/Multilayer-Ceramic-Capacitors-MLCC-SMD-SMT_TDK-C1005X7R1H104KT000F_C361198.html, Item Type=Capacitor, Manufacturer Part Number=C1005X7R1H104KT000F, RoHS=No, Supplier 1=Avnet, Supplier Part Number 1=C1005X7R1H104KT000F
C12 C13: library part CC0603KRX5R7BB106, "CAP CER 10UF 16V X5R 0603", Case Code (Imperial)=0603, Case Code (Metric)=1608, LCSC Part Number=C2936601, Manufacturer=Yageo, Max Operating Temperature=85°C, Min Operating Temperature=-55°C, Supplier Part Number 1=311-3486-1-ND, Tolerance=10%, Voltage Rating=16V, Capacitance=10uF, Case/Package=0603, Category="Ceramic Capacitors", ComponentLink1Description=http://www.yageo.com/documents/recent/UPY-GPHC_X5R_4V-to-50V_25.pdf?src-supplier=Digi-Key, ComponentLink1URL=http://www.yageo.com/documents/recent/UPY-GPHC_X5R_4V-to-50V_25.pdf?src-supplier=Digi-Key, Item Type=Capacitor, Manufacturer Part Number=CC0603KRX5R7BB106, Mount="Surface Mount", Packaging="Cut Tape", Pricing 1="1=0.68000, 10=0.48000, 50=0.36300, 100=0.31610, 500=0.23416, 1000=0.19903 (USD)", RoHS=Yes, RoHS Compliant=Yes, Stock 1=240725, Supplier 1=Digi-Key
C15 C21: library part CC0201BRNPO9BN4R7, "CAP CER 4.7PF 50V C0G/NPO 0201", Case/Package=0201, LCSC Part Number=C505471, Manufacturer=Yageo, Max Operating Temperature=125°C, Min Operating Temperature=-55°C, Voltage Rating=50V, Category="Ceramic Capacitors", ComponentLink1Description=https://www.yageo.com/upload/media/product/productsearch/datasheet/mlcc/UPY-GP_NP0_16V-to-50V_18.pdf?src-supplier=Digi-Key, ComponentLink1URL=https://www.yageo.com/upload/media/product/productsearch/datasheet/mlcc/UPY-GP_NP0_16V-to-50V_18.pdf?src-supplier=Digi-Key, ComponentLink2Description=http://www.yageo.com/documents/recent/UPY-GP_NP0_16V-to-50V_16.pdf?src-supplier=Digi-Key, ComponentLink2URL=http://www.yageo.com/documents/recent/UPY-GP_NP0_16V-to-50V_16.pdf?src-supplier=Digi-Key, Item Type=Capacitor, Length=0.024inch, Manufacturer Part Number=CC0201BRNPO9BN4R7, Mounting Technology="Surface Mount", Packaging="Tape and Reel", Pricing="15000=0.0023 (USD)", RoHS=Yes, RoHS Compliant=Yes, Series=CC, Stock=210000, Supplier="Arrow Electronics", Supplier Part Number=CC0201BRNPO9BN4R7, Thickness=0.013inch, Width=0.012inch
C16 C22 C76 C77 C79: library part CL05A475MO5NUNC, "CAP CER 4.7UF 16V X5R 0402", Case Code (Imperial)=0402, Case Code (Metric)=1005, Manufacturer=Samsung, Max Operating Temperature=85°C, Min Operating Temperature=-55°C, Tolerance=20%, Voltage Rating=16V, Capacitance=4.7uF, Case/Package=0402, Category="Ceramic Capacitors", ComponentLink1Description=http://www.farnell.com/datasheets/2710653.pdf?src-supplier=Farnell, ComponentLink1URL=http://www.farnell.com/datasheets/2710653.pdf?src-supplier=Farnell, ComponentLink2Description=http://www.samsungsem.com/kr/support/product-search/mlcc/CL05A475MO5NUNC.jsp?src-supplier=Digikey, ComponentLink2URL=http://www.samsungsem.com/kr/support/product-search/mlcc/CL05A475MO5NUNC.jsp?src-supplier=Digikey, ComponentLink3Description=http://www.farnell.com/datasheets/2710653.pdf?src-supplier=Element14, ComponentLink3URL=http://www.farnell.com/datasheets/2710653.pdf?src-supplier=Element14, ComponentLink4Description=https://datasheet.octopart.com/CL05A475MO5NUNC-Samsung-Electro-Mechanics-datasheet-123102911.pdf?src-supplier=Future+Electronics, ComponentLink4URL=https://datasheet.octopart.com/CL05A475MO5NUNC-Samsung-Electro-Mechanics-datasheet-123102911.pdf?src-supplier=Future+Electronics, ComponentLink5Description=http://www.farnell.com/datasheets/2710653.pdf?src-supplier=Newark, ComponentLink5URL=http://www.farnell.com/datasheets/2710653.pdf?src-supplier=Newark, Height=550um, Length=0.039inch, Manufacturer Part Number=CL05A475MO5NUNC, Material=4241ConductorMaterial, Mount="Surface Mount", Packaging="Cut Tape", Pricing 1="10000=0.09712 (USD)", RoHS=Yes, RoHS Compliant=Yes, Series=CL, Stock 1=50000, Supplier 1=Avnet, Supplier Part Number 1=CL05A475MO5NUNC, Thickness=0.022inch, Voltage Rating (DC)=16V, Width=0.02inch
C17: library part GRM0335C1H821JE01D, "CAP CER 820PF 50V C0G/NP0 0201", Case/Package=344Case, LCSC Part Number=C883565, Manufacturer=Murata, Max Operating Temperature=125°C, Min Operating Temperature=-55°C, Temperature Coefficient=30ppm/°C, Tolerance=5%, Voltage Rating=50V, Height=330um, Item Type=Capacitors, Length=600um, Manufacturer Part Number=GRM0335C1H821JE01D, Material=4241ConductorMaterial, Pricing="1=0.1, 10=0.01, 50=0.01, 100=0.006, 1000=0.005, 10000=0.003 (USD)", RoHS=Yes, Stock=39668, Supplier=Mouser, Thickness=300um, Voltage Rating (DC)=50V, Width=300um
C18 C20: library part C1005X5R1V105K050BC, "CAP CER 1UF 35V X5R 0402", Case Code (Imperial)=0402, Case Code (Metric)=1005, Dielectric=X5R, Dielectric Material=Ceramic, Manufacturer=TDK, Max Operating Temperature=85°C, Min Operating Temperature=-55°C, Supplier Part Number=445-9073-1-ND, Tolerance=10%, Voltage Rating=35V, Case/Package=0402, ComponentLink1Description=https://datasheet.ciiva.com/26834/getdatasheetpartid-750449-26834298.pdf?src-supplier=Verical, ComponentLink1URL=https://datasheet.ciiva.com/26834/getdatasheetpartid-750449-26834298.pdf?src-supplier=Verical, ComponentLink2Description=https://datasheet.ciiva.com/28451/1796654-28451087.pdf?src-supplier=Element14, ComponentLink2URL=https://datasheet.ciiva.com/28451/1796654-28451087.pdf?src-supplier=Element14, ComponentLink3Description=https://datasheet.ciiva.com/22719/1796654-22719533.pdf?src-supplier=Element14, ComponentLink3URL=https://datasheet.ciiva.com/22719/1796654-22719533.pdf?src-supplier=Element14, Depth=0.5mm, Item Type=Capacitors, Lead Free="Lead Free", Length=1mm, Manufacturer Part Number=C1005X5R1V105K050BC, Material=4241ConductorMaterial, Mounting Technology="Surface Mount", Packaging="Tape and Reel", Pricing="1=0.15, 10=0.087, 50=0.061, 100=0.0528, 500=0.03898, 1000=0.03468, 2500=0.03011, 5000=0.02735 (USD)", Radiation Hardening=No, Reach SVHC Compliant=No, RoHS=Yes, RoHS Compliant=Yes, Series=C, Stock=682645, Supplier=Digikey
C19: library part 04025A101JAT2A, "CAP CER 100PF 50V C0G/NP0 0402", Case Code (Imperial)=0402, Case Code (Metric)=1005, Dielectric=C0G, Insulation Resistance=1GR, LCSC Part Number=C597014, Manufacturer="Kyocera AVX", Max Operating Temperature=125°C, Min Operating Temperature=-55°C, Package Quantity=10000, Temperature Coefficient=30ppm/°C, Tolerance=5%, Voltage=50V, Capacitance=100pF, Case/Package=0402, Category="Ceramic Capacitors", ComponentLink1Description=https://datasheet.ciiva.com/11786/0900766b80def0e2-11786618.pdf?src-supplier=RSComponents, ComponentLink1URL=https://datasheet.ciiva.com/11786/0900766b80def0e2-11786618.pdf?src-supplier=RSComponents, ComponentLink2Description=https://datasheet.ciiva.com/1123/493359-1123473.pdf?src-supplier=Element14, ComponentLink2URL=https://datasheet.ciiva.com/1123/493359-1123473.pdf?src-supplier=Element14, ComponentLink3Description=https://datasheet.ciiva.com/1123/493359-1123474.pdf?src-supplier=Element14, ComponentLink3URL=https://datasheet.ciiva.com/1123/493359-1123474.pdf?src-supplier=Element14, ComponentLink4Description=https://datasheet.ciiva.com/16332/ccog-16332501.pdf?src-supplier=Future+Electronics, ComponentLink4URL=https://datasheet.ciiva.com/16332/ccog-16332501.pdf?src-supplier=Future+Electronics, ComponentLink5Description=https://datasheet.ciiva.com/46392/759117-46392007.pdf?src-supplier=Element14, ComponentLink5URL=https://datasheet.ciiva.com/46392/759117-46392007.pdf?src-supplier=Element14, ComponentLink6Description=https://datasheet.ciiva.com/150/ccog-150473.pdf?src-supplier=Digi-Key, ComponentLink6URL=https://datasheet.ciiva.com/150/ccog-150473.pdf?src-supplier=Digi-Key, ComponentLink7Description=https://datasheet.ciiva.com/150/ccog-150474.pdf?src-supplier=Digi-Key, ComponentLink7URL=https://datasheet.ciiva.com/150/ccog-150474.pdf?src-supplier=Digi-Key, ComponentLink8Description=https://datasheet.ciiva.com/2987/ccog-2987642.pdf?src-supplier=Avnet, ComponentLink8URL=https://datasheet.ciiva.com/2987/ccog-2987642.pdf?src-supplier=Avnet, ComponentLink9Description=https://datasheet.ciiva.com/150/ccog-150475.pdf?src-supplier=Digi-Key, ComponentLink9URL=https://datasheet.ciiva.com/150/ccog-150475.pdf?src-supplier=Digi-Key, ComponentLink10Description=https://datasheet.ciiva.com/8083/ccog-8083054.pdf?src-supplier=Avnet, ComponentLink10URL=https://datasheet.ciiva.com/8083/ccog-8083054.pdf?src-supplier=Avnet, ComponentLink11Description=https://datasheet.ciiva.com/5413/ccog-5413647.pdf?src-supplier=Mouser, ComponentLink11URL=https://datasheet.ciiva.com/5413/ccog-5413647.pdf?src-supplier=Mouser, Construction=Flat, Contact Plating=Tin,Matte, Depth=0.5mm, Dissipation Factor=2.5%, Height=0.56mm, Item Type=Capacitor, Lead Free="Lead Free", Length=1mm, Manufacturer Part Number=04025A101JAT2A, Mount="Surface Mount,PCB", Packaging="Tape and Reel", Pricing 1="10000=0.10788, 20000=0.10540, 40000=0.10292, 60000=0.10044, 80000=0.09796, 100000=0.09548, 1000000=0.09424 (USD)", Radiation Hardening=No, Reach SVHC Compliant=Yes, RoHS=Yes, RoHS Compliant=Yes, Series=-, Stock 1=3437500, Supplier 1=Avnet, Supplier Part Number 1=04025A101JAT2A, Termination=SMD/SMT, Thickness=0.013inch, Voltage Rating=50V, Voltage Rating (DC)=50V, Width=0.004inch
C26: library part CC0402JRX7R7BB104, "CAP CER 0.1UF 16V X7R 0402", Case Code (Imperial)=0402, Case Code (Metric)=1005, Dielectric=X7R, LCSC Part Number=C541464, Manufacturer=Yageo, Max Operating Temperature=125°C, Min Operating Temperature=-55°C, Package Quantity=10000, Supplier Part Number=311-1676-1-ND, Tolerance=5%, Voltage Rating=16V, Case/Package=0402, Category="Ceramic Capacitors", ComponentLink1Description=https://datasheet.ciiva.com/13210/upy-gphc-x7r-6-3v-to-50v-8-12304-13210152.pdf?src-supplier=Mouser, ComponentLink1URL=https://datasheet.ciiva.com/13210/upy-gphc-x7r-6-3v-to-50v-8-12304-13210152.pdf?src-supplier=Mouser, Construction=Flat, Halogen Free="Halogen Free", Height=0.5mm, Item Type=Capacitor, Lead Free="Lead Free", Length=0.039inch, Manufacturer Part Number=CC0402JRX7R7BB104, Material=4241ConductorMaterial, Mounting Technology="Surface Mount", Packaging="Tape and Reel", Pricing="1=0.1, 10=0.046, 50=0.0262, 100=0.0203, 500=0.01528, 1000=0.012, 2500=0.01091, 5000=0.01004 (USD)", RoHS=Yes, RoHS Compliant=Yes, Series=CC, Stock=1659111, Supplier=Digikey, Thickness=0.022inch, Voltage Rating (DC)=16V, Width=0.02inch
C29 C65: library part CC0402BRNPO9BN1R2, "CAP CER 1.2PF 50V C0G/NPO 0402", LCSC Part Number=C327292, Manufacturer=Yageo, Temperature Coefficient=30ppm/°C, ComponentLink1Description=https://datasheet.ciiva.com/13386/upy-gp-np0-16v-to-50v-8-13386283.pdf?src-supplier=Mouser, ComponentLink1URL=https://datasheet.ciiva.com/13386/upy-gp-np0-16v-to-50v-8-13386283.pdf?src-supplier=Mouser, ComponentLink2Description=https://datasheet.ciiva.com/15189/getdatasheetpartid-468320-15189100.pdf?src-supplier=Verical, ComponentLink2URL=https://datasheet.ciiva.com/15189/getdatasheetpartid-468320-15189100.pdf?src-supplier=Verical, ComponentLink3Description=https://datasheet.ciiva.com/11587/upy-gp-np0-16v-to-50v-8-11587117.pdf?src-supplier=Avnet, ComponentLink3URL=https://datasheet.ciiva.com/11587/upy-gp-np0-16v-to-50v-8-11587117.pdf?src-supplier=Avnet, Halogen Free=5694HalogenFree, Item Type=Capacitor, Manufacturer Part Number=CC0402BRNPO9BN1R2, Pricing="1=0.1, 10=0.032, 50=0.0184, 100=0.0142, 500=0.01068, 1000=0.00839, 2500=0.00762, 5000=0.00702 (USD)", RoHS=Yes, Stock=92678, Supplier=Digikey
C30 C31 C72 C73: library part GJM1555C1H120GB01D, "CAP CER 12PF 50V C0G/NP0 0402", Case Code (Imperial)=0402, Case Code (Metric)=1005, Dielectric=C0G, LCSC Part Number=C161305, Manufacturer=Murata, Max Operating Temperature=125°C, Min Operating Temperature=-55°C, Package Quantity=10000, Supplier Part Number 1=490-8078-1-ND, Tolerance=2%, Voltage Rating=50V, Capacitance=12pF, Case/Package=0402, Category="Ceramic Capacitors", ComponentLink1Description=https://datasheet.ciiva.com/11608/product-11608208.pdf?src-supplier=Avnet, ComponentLink1URL=https://datasheet.ciiva.com/11608/product-11608208.pdf?src-supplier=Avnet, ComponentLink2Description=https://datasheet.ciiva.com/29542/partnumbering-e-01-29542716.pdf?src-supplier=Digi-Key, ComponentLink2URL=https://datasheet.ciiva.com/29542/partnumbering-e-01-29542716.pdf?src-supplier=Digi-Key, ComponentLink3Description=https://datasheet.ciiva.com/29542/partnumbering-e-01-29542715.pdf?src-supplier=Digi-Key, ComponentLink3URL=https://datasheet.ciiva.com/29542/partnumbering-e-01-29542715.pdf?src-supplier=Digi-Key, ComponentLink4Description=https://datasheet.ciiva.com/29542/partnumbering-e-01-29542717.pdf?src-supplier=Digi-Key, ComponentLink4URL=https://datasheet.ciiva.com/29542/partnumbering-e-01-29542717.pdf?src-supplier=Digi-Key, Construction=Flat, Depth=0.5mm, Height=0.5mm, Lead Free="Lead Free", Length=1mm, Manufacturer Part Number=GJM1555C1H120GB01D, Mount="Surface Mount", Packaging="Tape and Reel", Pricing 1="1=0.18000, 10=0.12600, 50=0.07560, 100=0.06390, 500=0.04370, 1000=0.03865, 2500=0.03698, 5000=0.03361 (USD)", Radiation Hardening=No, RoHS=Yes, RoHS Compliant=Yes, Series=GJM, Stock 1=266975, Supplier 1=Digi-Key, Termination=SMD/SMT, Thickness=0.022inch, Voltage Rating (DC)=50V, Width=0.5mm
C44 C49 C59 C60: library part GRM1555C1H100JA01D, "CAP CER 10PF 50V C0G/NP0 0402", Case Code (Imperial)=0402, Case Code (Metric)=1005, Dielectric=C0G, LCSC Part Number=C76946, Manufacturer=Murata, Max Operating Temperature=125°C, Min Operating Temperature=-55°C, Package Quantity=1, Tolerance=5%, Voltage=50V, Case/Package=0402, Category="Ceramic Capacitors", ComponentLink1Description=https://datasheet.ciiva.com/2989/product-2989280.pdf?src-supplier=Avnet, ComponentLink1URL=https://datasheet.ciiva.com/2989/product-2989280.pdf?src-supplier=Avnet, ComponentLink2Description=https://datasheet.ciiva.com/18184/getdatasheetpartid-307234-18184164.pdf?src-supplier=Verical, ComponentLink2URL=https://datasheet.ciiva.com/18184/getdatasheetpartid-307234-18184164.pdf?src-supplier=Verical, ComponentLink3Description=https://datasheet.ciiva.com/29200/453545-da-01-en-vs-kondensator-0402-29200107.pdf?src-supplier=Conrad, ComponentLink3URL=https://datasheet.ciiva.com/29200/453545-da-01-en-vs-kondensator-0402-29200107.pdf?src-supplier=Conrad, ComponentLink4Description=https://datasheet.ciiva.com/7828/1666664-7828812.pdf?src-supplier=Element14, ComponentLink4URL=https://datasheet.ciiva.com/7828/1666664-7828812.pdf?src-supplier=Element14, ComponentLink5Description=https://datasheet.ciiva.com/6271/partnumbering-e-01-6271159.pdf?src-supplier=Digi-Key, ComponentLink5URL=https://datasheet.ciiva.com/6271/partnumbering-e-01-6271159.pdf?src-supplier=Digi-Key, ComponentLink6Description=https://datasheet.ciiva.com/6271/partnumbering-e-01-6271158.pdf?src-supplier=Digi-Key, ComponentLink6URL=https://datasheet.ciiva.com/6271/partnumbering-e-01-6271158.pdf?src-supplier=Digi-Key, ComponentLink7Description=https://datasheet.ciiva.com/6271/partnumbering-e-01-6271068.pdf?src-supplier=Digi-Key, ComponentLink7URL=https://datasheet.ciiva.com/6271/partnumbering-e-01-6271068.pdf?src-supplier=Digi-Key, Construction=Flat, Depth=0.5mm, Height=0.5mm, Item Type=Capacitor, Lead Free="Lead Free", Length=1mm, Manufacturer Part Number=GRM1555C1H100JA01D, Material=Ceramic, Mounting Technology="Surface Mount", Packaging="Tape and Reel", Pricing="10000=0.0034, 50000=0.0027, 100000=0.0023, 250000=0.0021 (USD)", Radiation Hardening=No, Reach SVHC Compliant=No, RoHS=Yes, RoHS Compliant=Yes, Series=GRM, Stock=3860000, Supplier="Arrow Electronics", Supplier Part Number=GRM1555C1H100JA01D, Termination=SMD/SMT, Thickness=0.022inch, Voltage Rating=50V, Voltage Rating (DC)=50V, Width=0.02inch
C45 C53: library part CC0402JRX7R9BB331, "CAP CER 330PF 50V X7R 0402", LCSC Part Number=C325463, Manufacturer=Yageo, ComponentLink1Description=https://datasheet.ciiva.com/13263/upy-gphc-x7r-6-3v-to-50v-8-12304-13263927.pdf?src-supplier=Mouser, ComponentLink1URL=https://datasheet.ciiva.com/13263/upy-gphc-x7r-6-3v-to-50v-8-12304-13263927.pdf?src-supplier=Mouser, Item Type=Capacitors, Lead Free=5697LeadFree, Manufacturer Part Number=CC0402JRX7R9BB331, Pins=2NUMBER, Pricing="1=0.1, 10=0.028, 100=0.0157, 1000=0.00973, 2500=0.00781, 5000=0.00736 (USD)", RoHS=Yes, RoHS Compliant=5897YesNo, Stock=55732, Supplier=Digikey
C46 C47 C50 C51 C52 C55 C56 C57 C58 C61 C62 C63 C67 C68 C69 C71: library part GRM155R71H104KE14D, "CAP CER 0.1UF 50V X7R 0402", Case Code (Imperial)=0402, Case Code (Metric)=1005, Dielectric=X7R, Dielectric Material=Ceramic, LCSC Part Number=C77020, Manufacturer=Murata, Max Operating Temperature=125°C, Min Operating Temperature=-55°C, Package Quantity=10000, Tolerance=10%, Voltage=50V, Case/Package=0402, ComponentLink1Description=http://www.farnell.com/datasheets/2079156.pdf?src-supplier=Farnell, ComponentLink1URL=http://www.farnell.com/datasheets/2079156.pdf?src-supplier=Farnell, ComponentLink2Description=http://www.mouser.com/ds/2/281/c02e-2905.pdf?src-supplier=Mouser, ComponentLink2URL=http://www.mouser.com/ds/2/281/c02e-2905.pdf?src-supplier=Mouser, ComponentLink3Description=https://datasheet.octopart.com/GRM155R71H104KE14D-Murata-datasheet-22122223.pdf?src-supplier=Future+Electronics, ComponentLink3URL=https://datasheet.octopart.com/GRM155R71H104KE14D-Murata-datasheet-22122223.pdf?src-supplier=Future+Electronics, ComponentLink4Description=http://www.farnell.com/datasheets/2079156.pdf?src-supplier=Newark, ComponentLink4URL=http://www.farnell.com/datasheets/2079156.pdf?src-supplier=Newark, ComponentLink5Description=https://datasheet.octopart.com/GRM155R71H104KE14D-Murata-datasheet-66077078.pdf?src-supplier=Element14, ComponentLink5URL=https://datasheet.octopart.com/GRM155R71H104KE14D-Murata-datasheet-66077078.pdf?src-supplier=Element14, ComponentLink6Description=https://search.murata.co.jp/Ceramy/image/img/A01X/G101/ENG/GRM155R71H104KE14-01.pdf?src-supplier=Digikey, ComponentLink6URL=https://search.murata.co.jp/Ceramy/image/img/A01X/G101/ENG/GRM155R71H104KE14-01.pdf?src-supplier=Digikey, Construction=Flat, Depth=0.5mm, Dissipation Factor=0.025%, Height=0.5mm, Item Type=Capacitors, Lead Free=5697LeadFree, Length=1mm, Manufacturer Part Number=GRM155R71H104KE14D, Material=Ceramic, Mounting Technology="Surface Mount", Packaging="Tape and Reel", Pins=2NUMBER, Pricing="10000=0.0034, 40000=0.0033, 150000=0.0032, 250000=0.0031, 500000=0.003 (USD)", Reach SVHC Compliant=No, RoHS=Yes, RoHS Compliant=Yes, Series=GRM, Stock=45820000, Supplier="Future Electronics", Termination=SMD/SMT, Thickness=0.022inch, Voltage Rating=50V, Voltage Rating (DC)=50V, Weight=0.000212oz, Width=0.5mm
C48: library part GRM188R60J476ME15D, "CAP CER 47UF 6.3V X5R 0603", Dielectric=1537DielectricType, LCSC Part Number=C140782, Manufacturer=Murata, Voltage Rating (DC)=6.3V, ComponentLink1Description=https://datasheet.octopart.com/GRM188R60J476ME15D-Murata-datasheet-149523200.pdf?src-supplier=Newark, ComponentLink1URL=https://datasheet.octopart.com/GRM188R60J476ME15D-Murata-datasheet-149523200.pdf?src-supplier=Newark, ComponentLink2Description=https://datasheet.octopart.com/GRM188R60J476ME15D-Murata-datasheet-102370999.pdf?src-supplier=Future+Electronics, ComponentLink2URL=https://datasheet.octopart.com/GRM188R60J476ME15D-Murata-datasheet-102370999.pdf?src-supplier=Future+Electronics, ComponentLink3Description=https://www.murata.com/~/media/webrenewal/support/library/catalog/products/capacitor/mlcc/c02e.ashx?la=en-us&src-supplier=Digikey, ComponentLink3URL=https://www.murata.com/~/media/webrenewal/support/library/catalog/products/capacitor/mlcc/c02e.ashx?la=en-us&src-supplier=Digikey, ComponentLink4Description=http://search.murata.co.jp/Ceramy/image/img/A01X/G101/ENG/GRM188R60J476ME15-01.pdf?src-supplier=Digikey, ComponentLink4URL=http://search.murata.co.jp/Ceramy/image/img/A01X/G101/ENG/GRM188R60J476ME15-01.pdf?src-supplier=Digikey, ComponentLink5Description=https://datasheet.octopart.com/GRM188R60J476ME15D-Murata-datasheet-165579666.pdf?src-supplier=TME, ComponentLink5URL=https://datasheet.octopart.com/GRM188R60J476ME15D-Murata-datasheet-165579666.pdf?src-supplier=TME, Height=1mm, Item Type=Capacitors, Manufacturer Part Number=GRM188R60J476ME15D, Material=4241ConductorMaterial, Pricing="4000=0.108, 8000=0.106, 12000=0.105, 16000=0.104, 20000=0.102 (USD)", RoHS=Yes, Stock=324000, Supplier="Future Electronics"